# Altium PCB PCI Express_16765X6890_64PIN_Low profile.PCBDOC (part 4 of 5)
Units mm, origin at the board's own origin, x right, y up, seen from the top; angles counter-clockwise.
Board outline 167.65 x 68.9 mm, 6 copper layers (TopLayer, AGround_Layer, InternalPlane1, Power_Layer, Ground_Layer, BottomLayer), stack 1.141 mm thick; 897 components, 648 nets, 2942 pads, 321 vias.
Unrouted connection lines stored in the file: 1996.
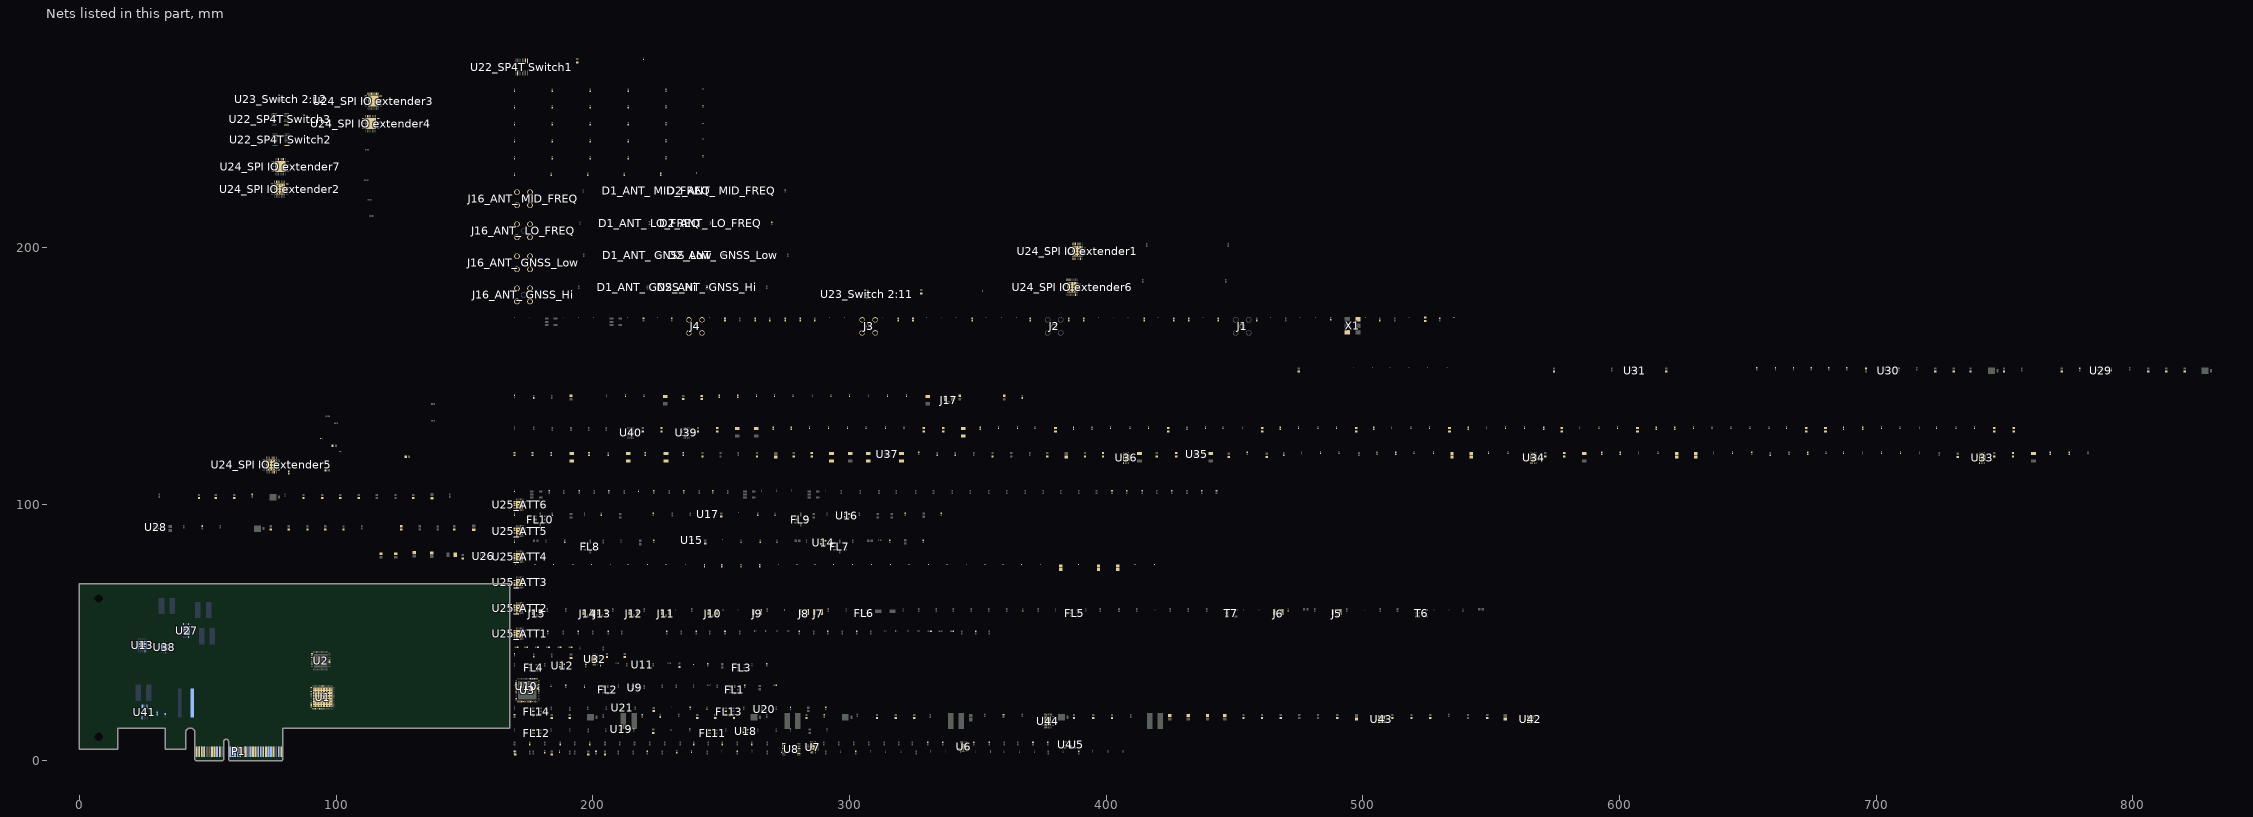
[diagram p5: the nets of this part, all layers, seen from the top]

## Via types
v1: diameter 0.5, hole 0.2, TopLayer to BottomLayer, 309 vias
v2: diameter 0.5, hole 0.2, TopLayer to BottomLayer, tented top, 8 vias
v3: diameter 0.5, hole 0.3, TopLayer to BottomLayer, 4 vias

## Nets (pads, with @x,y where several pads share a name; then routed paths per layer and width w, separated by ;. In a path a pad name is that pad's centre, name@x,y a point inside that pad or via, vN(x,y) a via of type N, cw(c..) or ccw(c..) an arc to the next point about the centre after c; other vN are vias at no path point) (continued)
AIn_9690_P: R111.2 U1.6
AnOutMax_N: C100.1 U13.16
AnOutMax_P: C98.1 U13.15
ATT_CTRL_11: "U24_SPI IO extender4.17" U25_ATT5.19
ATT_CTRL_12: "U24_SPI IO extender4.18" U25_ATT5.20
ATT_CTRL_13: "U24_SPI IO extender4.19" U25_ATT5.21
ATT_CTRL_14: "U24_SPI IO extender4.20" U25_ATT5.22
ATT_CTRL_15: "U24_SPI IO extender4.21" U25_ATT5.23
ATT_CTRL_16: "U24_SPI IO extender4.22" U25_ATT5.24
ATT_CTRL_21: "U24_SPI IO extender4.25" U25_ATT6.19
ATT_CTRL_22: "U24_SPI IO extender4.26" U25_ATT6.20
ATT_CTRL_23: "U24_SPI IO extender4.27" U25_ATT6.21
ATT_CTRL_24: "U24_SPI IO extender4.28" U25_ATT6.22
ATT_CTRL_25: "U24_SPI IO extender4.1" U25_ATT6.23
ATT_CTRL_26: "U24_SPI IO extender4.2" U25_ATT6.24
ATT_Ctrl_31: "U24_SPI IO extender3.17" U25_ATT1.19
ATT_Ctrl_32: "U24_SPI IO extender3.18" U25_ATT1.20
ATT_Ctrl_33: "U24_SPI IO extender3.19" U25_ATT1.21
ATT_Ctrl_34: "U24_SPI IO extender3.20" U25_ATT1.22
ATT_Ctrl_35: "U24_SPI IO extender3.21" U25_ATT1.23
ATT_Ctrl_36: "U24_SPI IO extender3.22" U25_ATT1.24
ATT_Ctrl_41: "U24_SPI IO extender3.25" U25_ATT3.19
ATT_Ctrl_42: "U24_SPI IO extender3.26" U25_ATT3.20
ATT_Ctrl_43: "U24_SPI IO extender3.27" U25_ATT3.21
ATT_Ctrl_44: "U24_SPI IO extender3.28" U25_ATT3.22
ATT_Ctrl_45: "U24_SPI IO extender3.1" U25_ATT3.23
ATT_Ctrl_46: "U24_SPI IO extender3.2" U25_ATT3.24
ATT_Ctrl_51: "U24_SPI IO extender2.17" U25_ATT2.19
ATT_Ctrl_52: "U24_SPI IO extender2.18" U25_ATT2.20
ATT_Ctrl_53: "U24_SPI IO extender2.19" U25_ATT2.21
ATT_Ctrl_54: "U24_SPI IO extender2.20" U25_ATT2.22
ATT_Ctrl_55: "U24_SPI IO extender2.21" U25_ATT2.23
ATT_Ctrl_56: "U24_SPI IO extender2.22" U25_ATT2.24
ATT_CTRL_61: "U24_SPI IO extender2.25" U25_ATT4.19
ATT_CTRL_62: "U24_SPI IO extender2.26" U25_ATT4.20
ATT_CTRL_63: "U24_SPI IO extender2.27" U25_ATT4.21
ATT_CTRL_64: "U24_SPI IO extender2.28" U25_ATT4.22
ATT_CTRL_65: "U24_SPI IO extender2.1" U25_ATT4.23
ATT_CTRL_66: "U24_SPI IO extender2.2" U25_ATT4.24
ATT_GND_ATT1: "C156_SP4T Switch1.1" "C156_SP4T Switch2.1" "C156_SP4T Switch3.1" "C157_SP4T Switch1.1" "C157_SP4T Switch2.1" "C157_SP4T Switch3.1" "C158_Switch 2:11.1" "C158_Switch 2:12.1" "C159_Switch 2:11.1" "C159_Switch 2:12.1" "D1_ANT_ GNSS_Hi.2" "D1_ANT_ GNSS_Low.2" "D1_ANT_ LO_FREQ.2" "D1_ANT_ MID_FREQ.2" "D2_ANT_ GNSS_Hi.7" "D2_ANT_ GNSS_Low.7" "D2_ANT_ LO_FREQ.7" "D2_ANT_ MID_FREQ.7" "J16_ANT_ GNSS_Hi.2" "J16_ANT_ GNSS_Hi.3" "J16_ANT_ GNSS_Hi.4" "J16_ANT_ GNSS_Hi.5" "J16_ANT_ GNSS_Low.2" "J16_ANT_ GNSS_Low.3" "J16_ANT_ GNSS_Low.4" "J16_ANT_ GNSS_Low.5" "J16_ANT_ LO_FREQ.2" "J16_ANT_ LO_FREQ.3" "J16_ANT_ LO_FREQ.4" "J16_ANT_ LO_FREQ.5" "J16_ANT_ MID_FREQ.2" "J16_ANT_ MID_FREQ.3" "J16_ANT_ MID_FREQ.4" "J16_ANT_ MID_FREQ.5" "U22_SP4T Switch1.2" "U22_SP4T Switch2.2" "U22_SP4T Switch3.2" "U23_Switch 2:11.3" "U23_Switch 2:12.3" "U24_SPI IO extender6.6" "U24_SPI IO extender6.29" "U24_SPI IO extender7.6" "U24_SPI IO extender7.29" C9.2 C10.2 C18.1 C19.1 C20.2 C22.2 C23.1 C24.1 C80.2 C83.1 C84.1 C85.1 C89.1 C95.1 C102.2 C103.2 C106.1 C107.1 C109.1 C110.1 C114.1 C116.1 C117.2 C118.2 C121.1 C122.1 C123.1 C124.1 C130.1 C131.1 C134.2 C135.2 C139.1 C140.1 C145.2 C146.2 C149.1 C150.1 C160_ATT1.1 C160_ATT2.1 C160_ATT3.1 C160_ATT4.1 C160_ATT5.1 C160_ATT6.1 C161_ATT1.1 C161_ATT2.1 C161_ATT3.1 C161_ATT4.1 C161_ATT5.1 C161_ATT6.1 C162_ATT1.1 C162_ATT2.1 C162_ATT3.1 C162_ATT4.1 C162_ATT5.1 C162_ATT6.1 C163_ATT1.1 C163_ATT2.1 C163_ATT3.1 C163_ATT4.1 C163_ATT5.1 C163_ATT6.1 C164_ATT1.1 C164_ATT2.1 C164_ATT3.1 C164_ATT4.1 C164_ATT5.1 C164_ATT6.1 C165_ATT1.1 C165_ATT2.1 C165_ATT3.1 C165_ATT4.1 C165_ATT5.1 C165_ATT6.1 FL1.1 FL2.1 FL3.1 FL4.1 FL5.1 FL6.1 FL7.1 FL8.1 FL9.2 FL10.2 FL11.1 FL12.1 FL13.2 FL14.2 J5.1 J5.3 J6.1 J6.3 J7.1 J7.3 J8.1 J8.3 J9.1 J9.3 J10.1 J10.3 J11.1 J11.3 J12.1 J12.3 J13.1 J13.3 J14.1 J14.3 J15.1 J15.3 R125.2 R127.2 R129.2 R131.2 R133.2 R135.2 T6.1 T7.1 U9.2 U9.4 U10.1 U11.1 U12.2 U12.4 U14.2 U14.4 U15.4 U16.2 U16.4 U17.4 U18.2 U18.4 U19.1 U20.2 U20.4 U21.1 U25_ATT1.1 U25_ATT1.25 U25_ATT2.1 U25_ATT2.25 U25_ATT3.1 U25_ATT3.25 U25_ATT4.1 U25_ATT4.25 U25_ATT5.1 U25_ATT5.25 U25_ATT6.1 U25_ATT6.25
  other v1: 170.949,48.95 172.049,48.95 170.949,50.05 172.049,50.05 170.949,58.95 172.049,58.95 170.949,60.05 172.049,60.05 170.949,68.95 172.049,68.95 170.949,70.05 172.049,70.05 170.949,78.95 172.049,78.95 170.949,80.05 172.049,80.05 170.949,88.95 172.049,88.95 170.949,90.05 172.049,90.05 170.949,99.2 172.049,99.2 170.949,100.3 172.049,100.3 385.099,182.849 386.199,182.849 387.299,182.849 388.399,182.849 385.099,183.949 386.199,183.949 387.299,183.949 388.399,183.949 385.099,185.049 386.199,185.049 387.299,185.049 388.399,185.049 385.099,186.149 386.199,186.149 387.299,186.149 388.399,186.149
ATT_RF1_ATT1: C141.2 U25_ATT1.4
ATT_RF1_ATT2: C151.2 U25_ATT2.4
ATT_RF1_ATT3: C17.2 U25_ATT3.4
ATT_RF1_ATT4: C28.2 R71.2 U25_ATT4.4
ATT_RF1_ATT5: "C133_ANT_ LO_FREQ.2" U25_ATT5.4
ATT_RF1_ATT6: "C133_ANT_ MID_FREQ.2" U25_ATT6.4
ATT_RF2_ATT1: C137.2 U25_ATT1.15
ATT_RF2_ATT2: C147.1 U25_ATT2.15
ATT_RF2_ATT3: C16.1 U25_ATT3.15
ATT_RF2_ATT4: C27.1 U25_ATT4.15
ATT_RF2_ATT5: C108.1 C112.2 U25_ATT5.15
ATT_RF2_ATT6: C126.2 C128.1 U25_ATT6.15
ATT_Vcc_ATT1: C160_ATT1.2 C161_ATT1.2 FB5.2 U25_ATT1.2
ATT_Vcc_ATT2: C160_ATT2.2 C161_ATT2.2 FB7.2 U25_ATT2.2
ATT_Vcc_ATT3: C160_ATT3.2 C161_ATT3.2 FB6.2 U25_ATT3.2
ATT_Vcc_ATT4: C160_ATT4.2 C161_ATT4.2 FB8.2 U25_ATT4.2
ATT_Vcc_ATT5: C160_ATT5.2 C161_ATT5.2 FB1.2 U25_ATT5.2
ATT_Vcc_ATT6: C160_ATT6.2 C161_ATT6.2 FB3.2 U25_ATT6.2
CLK_GND: C31.1 C32.1 C33.1 C34.2 C35.2 C42.1 R74.2 R79.1 R80.1 R81.1 R83.2 R84.2 R87.1 R88.1 R90.2 R91.2
CLKin0_N: P1.A14 R86.1 R87.2
CLKin0_P: P1.A13 R90.1 R92.1
CLKin0P_N: C44.1 R86.2 R88.2 R89.2
CLKin0P_P: C45.1 R89.1 R91.1 R92.2
CLKin1_N: J2.1 R83.1 R85.1
CLKin1_P: J1.1 R77.1 R79.2
CLKin1P_N: C43.1 R82.1 R84.1 R85.2
CLKin1P_P: C41.1 R77.2 R80.2 R82.2
CLKout1_N: C47.1 U3.17
CLKout1_P: C46.1 U3.16
CLKout2_N: C49.1 U3.19
CLKout2_P: C48.1 U3.18
CLKout3_N: C59.1 U3.22
CLKout3_P: C58.1 U3.21
CLKout5_N: C63.1 U3.27
CLKout5_P: C61.1 U3.26
CLKout6_N: C51.1 U3.44
CLKout6_P: C50.1 U3.45
CLKout8_N: R97.2 U3.49
CLKout8_P: R93.1 U3.50
CLKout9_N: C53.1 U3.52
CLKout9_P: C52.1 U3.53
CLKout10_N: C55.1 U3.54
CLKout10_P: C54.1 U3.55
CMLout1_N: C1.1 U1.22
CMLout1_P: C2.1 U1.23
CMLout2_N: C3.1 U1.24
CMLout2_P: C4.1 U1.25
CMLout3_N: C6.1 U2.31
CMLout3_P: C5.1 U2.32
CMLout4_N: C8.1 U2.29
CMLout4_P: C7.1 U2.30
"Ctrl_ADG_Switch 2:11": "U23_Switch 2:11.2" "U24_SPI IO extender6.20"
"Ctrl_ADG_Switch 2:12": "U23_Switch 2:12.2" "U24_SPI IO extender7.26"
CTRL_VCXO: C34.1 R75.1 U3.41
DCDC1_PG: "U24_SPI IO extender5.21" U44.23
DCDC2_PG: "U24_SPI IO extender5.22" U27.23
DGND: C281.1 C282.1 C283.1 C284.1 C285.1 C286.1 C287.1 C288.1 C295.1 C296.1 C303.2 FB29.2 R194.1 U1.16 U36.6 U36.17
  other v1: 407.199,117.45 408.299,117.45 407.199,118.55 408.299,118.55
En_9690_Power: "U24_SPI IO extender1.17" U26.5 U30.4 U33.4 U34.4 U35.5 U36.4 U37.5
En_DCDC: U4.3 U27.16 U44.16
En_LTC2122: "U24_SPI IO extender5.17" U38.4
En_PWR_2771: "U24_SPI IO extender1.2" U31.4
En_PWR_LMK: "U24_SPI IO extender1.21" U39.4 U40.4
En_PWR_RF_2.5: "U24_SPI IO extender1.25" U29.4
En_PWR_RF_2.8: "U24_SPI IO extender1.26" U42.8
En_PWR_RF_3.3: "U24_SPI IO extender1.27" U28.5
En_PWR_RF_5: "U24_SPI IO extender1.28" U43.8
GND: "U24_SPI IO extender1.6" "U24_SPI IO extender1.29" "U24_SPI IO extender2.6" "U24_SPI IO extender2.29" "U24_SPI IO extender3.6" "U24_SPI IO extender3.29" "U24_SPI IO extender4.6" "U24_SPI IO extender4.29" "U24_SPI IO extender5.6" "U24_SPI IO extender5.29" C67.1 C76.1 C77.1 C78.1 C166.2 C167.2 C168.2 C169.2 C175.1 C176.1 C177.1 C178.1 C182.1 C183.1 C184.1 C185.1 C189.1 C190.1 C192.1 C193.1 C194.1 C196.1 C198.1 C199.1 C200.1 C208.1 C216.1 C219.1 C220.2 C261.1 C292.1 C294.1 C297.1 C304.1 C328.2 C389.1 C394.1 C399.2 C400.2 C401.2 C402.2 C403.1 C404.1 C405.1 C409.1 C410.1 C411.1 C412.1 C414.1 C415.1 C416.1 C418.1 C419.1 J3.2 J3.3 J3.4 J3.5 J4.2 J4.3 J4.4 J4.5 P1.A4 P1.A12 P1.A15 P1.A18 P1.A20 P1.A23 P1.A24 P1.A27 P1.A28 P1.A31 P1.B4 P1.B7 P1.B13 P1.B16 P1.B18 P1.B21 P1.B22 P1.B25 P1.B26 P1.B29 P1.B32 R1.2 R3.2 R5.2 R7.2 R9.2 R11.2 R17.2 R19.2 R21.2 R23.2 R25.2 R27.2 R44.2 R46.2 R48.2 R50.1 R52.1 R54.1 R63.1 R65.1 R67.1 R94.1 R96.2 R175.2 R178.2 R181.1 R182.2 R184.2 R186.1 R212.2 R214.2 R216.1 R217.2 R219.2 U4.6 U5.6 U6.7 U6.15 U7.6 U7.17 U8.4 U27.10 U27.18 U27.27 U27.29 U32.6 U32.17 U41.7 U44.10 U44.18 U44.27 U44.29
  other v1: 376.699,14.4 377.799,14.4 376.699,15.5 377.799,15.5 376.699,16.6 377.799,16.6 200.199,38.95 201.299,38.95 200.199,40.05 201.299,40.05 41.225,49.65 42.325,49.65 41.225,50.75 42.325,50.75 41.225,51.85 42.325,51.85 73.099,113.599 74.199,113.599 75.299,113.599 76.399,113.599 73.099,114.699 74.199,114.699 75.299,114.699 76.399,114.699 73.099,115.799 74.199,115.799 75.299,115.799 76.399,115.799 73.099,116.899 74.199,116.899 75.299,116.899 76.399,116.899 387.099,196.849 388.199,196.849 389.299,196.849 390.399,196.849 387.099,197.949 388.199,197.949 389.299,197.949 390.399,197.949 387.099,199.049 388.199,199.049 389.299,199.049 390.399,199.049 387.099,200.149 388.199,200.149 389.299,200.149 390.399,200.149 76.4,221.1 77.5,221.1 78.6,221.1 79.7,221.1 76.4,222.2 77.5,222.2 78.6,222.2 79.7,222.2 76.4,223.3 77.5,223.3 78.6,223.3 79.7,223.3 76.4,224.4 77.5,224.4 78.6,224.4 79.7,224.4
  other v2: 284.999,4.5 286.499,4.5 285.749,5.25 284.999,6 286.499,6
  other v3: 343.999,5 344.999,5 343.999,6 344.999,6
GND_VXCO: C38.1 C368.1 C369.1 C370.1 FB55.1 X1.3
"HMC_A_SP4T Switch1": "U22_SP4T Switch1.10" "U24_SPI IO extender6.24"
"HMC_A_SP4T Switch2": "U22_SP4T Switch2.10" "U24_SPI IO extender6.21"
"HMC_A_SP4T Switch3": "U22_SP4T Switch3.10" "U24_SPI IO extender7.23"
"HMC_B_SP4T Switch1": "U22_SP4T Switch1.9" "U24_SPI IO extender6.25"
"HMC_B_SP4T Switch2": "U22_SP4T Switch2.9" "U24_SPI IO extender7.19"
"HMC_B_SP4T Switch3": "U22_SP4T Switch3.9" "U24_SPI IO extender7.24"
I2C0_SCL: "R170_SPI IO extender5.1" "U24_SPI IO extender5.8" R43.2 R205.1 U4.1 U7.12 U41.5